# Altium PCB OmniCore_SDR.PcbDoc (part 13 of 14)
Units mil, origin at the board's own origin, x right, y up, seen from the top; angles counter-clockwise.
Board outline 4724.72 x 2755.91 mil, 8 copper layers (Top, GND 1, Layer 1, Layer 2, GND 2, Layer 3, Power, Bottom), stack 40.468 mil thick; 534 components, 427 nets, 2325 pads, 1892 vias.
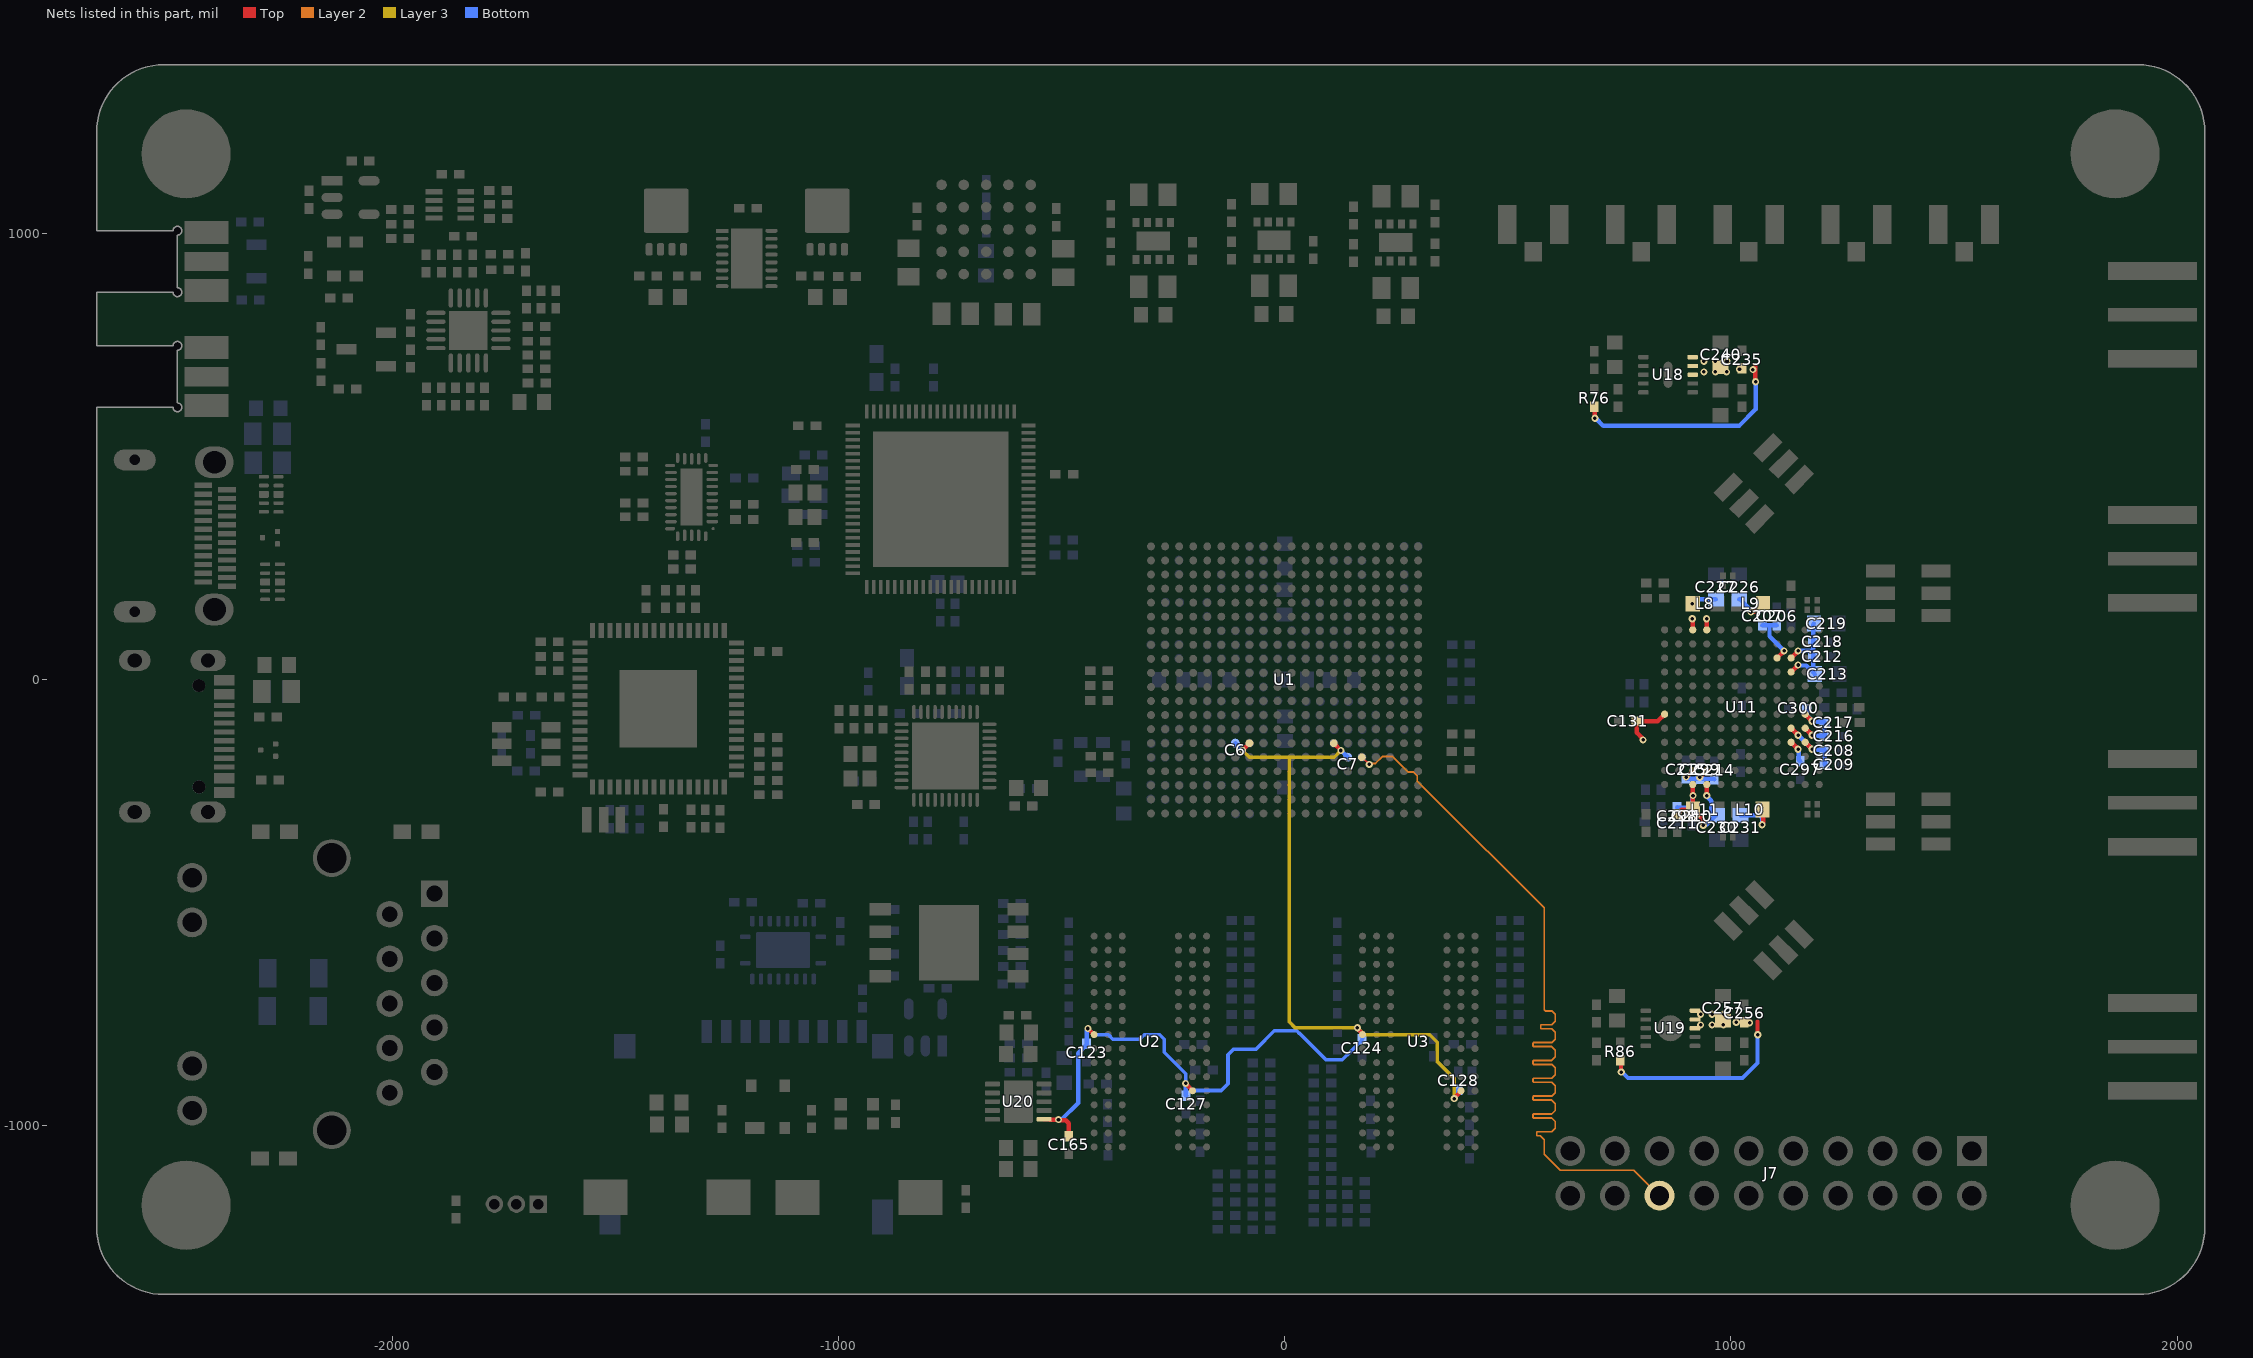
[diagram p18: the nets of this part, all layers, seen from the top]

## Via types
v1: diameter 16, hole 8, Top to Bottom, tented both sides, 1844 vias
v2: diameter 19.68, hole 7.87, Top to Bottom, 44 vias
v3: diameter 200, hole 125, Top to Bottom, 4 vias

## Nets (pads, with @x,y where several pads share a name; then routed paths per layer and width w, separated by ;. In a path a pad name is that pad's centre, name@x,y a point inside that pad or via, vN(x,y) a via of type N, cw(c..) or ccw(c..) an arc to the next point about the centre after c; other vN are vias at no path point) (continued)
USER_IO6_P: J7.16 U1.T5 | length 1985.8
  Top w4.2: U1.T5@172.98,-174.02 173.2,-174.02 189.4,-190.21 v1(189.62,-190.21)
  Layer 2 w4: v1(189.62,-190.21) 191.92,-187.92 203.61,-187.92 218.95,-172.58 242.33,-172.58 277.02,-207.26 289.02,-207.26 297.22,-215.46 297.22,-227.46 326.46,-256.7 581.5,-511.74 581.5,-734.9 581.5,-740.12 583.84,-742.47 598.71,-742.47 606.5,-750.26 606.5,-765.67 598.71,-773.47 575.15,-773.47 573.8,-774.82 573.8,-781.12 575.15,-782.47 598.71,-782.47 606.5,-790.26 606.5,-805.67 598.71,-813.47 557.85,-813.47 556.5,-814.82 556.5,-821.12 557.85,-822.47 598.71,-822.47 606.5,-830.26 606.5,-845.67 598.71,-853.47 557.85,-853.47 556.5,-854.82 556.5,-861.12 557.85,-862.47 598.71,-862.47 606.5,-870.26 606.5,-885.67 598.71,-893.47 557.85,-893.47 556.5,-894.82 556.5,-901.12 557.85,-902.47 598.71,-902.47 606.5,-910.26 606.5,-925.67 598.71,-933.47 557.85,-933.47 556.5,-934.82 556.5,-941.12 557.85,-942.47 598.71,-942.47 606.5,-950.26 606.5,-965.67 598.71,-973.47 557.85,-973.47 556.5,-974.82 556.5,-981.12 557.85,-982.47 598.71,-982.47 606.5,-990.26 606.5,-1005.67 598.71,-1013.47 566.34,-1013.47 564.99,-1014.82 564.99,-1021.12 566.34,-1022.47 572.71,-1022.47 581.5,-1031.25 581.5,-1050.7 581.5,-1063.6 617.47,-1099.57 782.7,-1099.57 839.63,-1156.5 J7.16@840,-1156.5
VDD_DIG: C131.2 C206.2 C207.2 C208.2 C209.2 C210.2 C211.2 C226.1 C227.1 C230.1 C231.1 C235.1 C240.1 C297.2 C298.2 L8.1 L9.1 L10.1 L11.1 R76.1 U11.A9 U11.A10 U11.D2 U11.D3 U11.E3 U11.F12 U11.K4 U11.M9 U11.M10 U18.8 U18.9 U18.10 | length 1565.3
  Top w4.2: v1(913.5,136.46) v1@914,135.95 ; U11.M10@914,111.94 U11.M10@914.5,111.44 ; v1(945.5,136.46) v1@945.75,136.2 ; U11.M9@945.75,111.69 U11.M9@946,111.44
  Top w10: R76.1@693.77,611.25 694.54,610.48 694.54,586.26 v1(695.3,585.5) ; v1(803.35,-135) 803.35,-133.38 788.69,-118.71 C131.2@788.69,-93 836.05,-93 U11.F12@851.51,-77.54 ; C211.2@885.34,-297.02 880.5,-301.86 880.5,-299.89 889.19,-291.2 L11.1@915,-291.2 ; U11.M10@914,111.94 v1@914,135.95 ; U11.A10@914.5,-235.02 914.75,-235.27 914.75,-259.75 v1(915,-260) L11.1@915,-291.2 ; L11.1@916.64,-291.2 L11.1@915,-291.2 ; v1(938.1,-326.6) 936.95,-325.45 936.95,-313.48 915,-291.53 L11.1@915,-291.2 ; U11.M9@945.75,111.69 v1@945.75,136.2 ; v1(946,-260) U11.A9@946,-235.02 ; C235.1@1024.77,697.25 1029.05,697.25 C235.1@1029.3,697.5 ; v1(1044.8,151.3) 1045.95,152.45 1053.11,152.45 1057.84,157.18 1059.81,157.18 1070.56,167.93 L9.1@1070.56,169.9 ; 1054.3,703.5 1054.3,668.5 v1(1055.3,667.5) ; v1(1069.9,-325.3) 1069.9,-323.68 1072.76,-320.82 L10.1@1072.76,-291.2 ; U11.K4@1103.48,48.45 v1(1119.23,64.2) ; U11.D3@1134.98,-140.53 v1(1150.72,-156.28) ; U11.E3@1134.98,-109.03 v1(1150.72,-124.78) ; U11.D2@1166.47,-140.53 v1(1182.22,-156.28)
  Bottom w10: v1(695.3,585.5) 696.92,585.5 713.92,568.5 1018.3,568.5 1055.3,605.5 v1(1055.3,667.5) ; C298.2@879.5,-286.54 879.65,-286.7 912.34,-286.7 913.85,-285.19 913.85,-261.15 v1(915,-260) ; v1(913.54,169.9) 915.16,169.9 925.16,179.9 C227.1@966.5,179.9 ; v1(938.1,-326.6) 939.25,-325.45 945.06,-325.45 965.54,-304.97 965.54,-303 955.78,-293.24 955.78,-271.4 946,-261.62 v1(946,-260) ; C226.1@1018.5,179.9 1020.46,179.9 1043.65,156.71 1043.65,152.45 v1(1044.8,151.3) ; C231.1@1021.5,-303.98 1064.04,-303.98 1069.9,-309.84 v1(1069.9,-325.3) ; C207.2@1070.5,121.77 1086.5,121.77 ; C206.2@1102.5,121.77 1086.5,121.77 ; v1(1119.23,64.2) 1086.5,96.93 1086.5,121.77 ; v1(1150.72,-156.28) 1151.87,-157.42 1151.87,-179.23 C297.2@1155.5,-182.86 ; v1(1150.72,-124.78) v1(1182.22,-156.28) 1183.37,-157.42 1208.74,-157.42 C208.2@1210.31,-159 C209.2@1210.31,-191
  other v1: 939.3,689.5 965.3,689.5 990.3,689.5 1049.3,694.5 1019.3,695.5 939.3,713.5 965.3,713.5 991.3,713.5
VDDA_RX_LO: C212.2 C213.2 C214.2 C215.2 C216.2 C217.2 C218.2 C219.2 C256.1 C257.1 C299.2 C300.2 R86.1 U11.B9 U11.B10 U11.E2 U11.F2 U11.J3 U11.K3 U19.8 U19.9 U19.10 | length 960.3
  Top w9: R86.1@751.98,-853.28 753.19,-854.49 753.19,-878.31 v1(754.39,-879.51) ; v1(1060,-796) 1060,-766
  Top w10: v1@900.5,-220.64 900.5,-219.08 914.5,-205.08 U11.B10@914.5,-203.52 ; v1(930.25,-219.27) U11.B9@946,-203.52 ; U11.J3@1134.98,16.95 v1(1150.72,32.7) ; U11.K3@1134.98,48.45 v1(1150.72,64.2) ; U11.E2@1166.47,-109.07 v1@1182.14,-124.74 ; U11.F2@1166.47,-77.54 v1(1182.22,-93.28)
  Bottom w9: v1(754.39,-879.51) 756.28,-879.51 769.77,-893 1026,-893 1060,-859 v1(1060,-796)
  Bottom w10: v1(899.5,-218.64) 902.58,-221.73 927.79,-221.73 v1(930.25,-219.27) 933.71,-222.73 962,-222.73 C214.2@962.5,-223.23 ; v1(1150.72,32.7) 1151.87,31.55 1168.84,31.55 1175.22,25.17 1177.19,25.17 C213.2@1184.5,17.87 ; v1(1150.72,64.2) 1180.89,64.2 1184.65,67.96 ; C300.2@1170.2,-64.56 1170.2,-79.64 1182.22,-91.66 v1(1182.22,-93.28) 1183.37,-94.43 1207.7,-94.43 C217.2@1209.81,-96.54 1210.31,-97.04 C216.2@1210.31,-127.04 ; v1(1182.14,-124.78) 1183.29,-125.93 1209.2,-125.93 C216.2@1210.31,-127.04 ; C219.2@1185.94,125.46 1184.81,124.33 C218.2@1184.81,84.46 1184.65,84.3 1184.65,67.96 ; C213.2@1187.94,12.46 1184.5,15.9 C213.2@1184.5,17.87 ; C216.2@1210.81,-127.54 C216.2@1210.31,-127.04 ; C213.2@1184.5,17.87 C212.2@1184.5,51.46 1184.65,51.61 1184.65,67.96
  other v1: 932,-774 958,-774 983,-774 1042,-769 1012,-768 932,-750 958,-750 984,-750
VTTREF: C6.2 C7.2 C123.1 C124.1 C127.2 C128.2 C165.1 U1.H6 U1.P6 U2.H1 U2.M8 U3.H1 U3.M8 U20.6 | length 2751.5
  Top w4.2: v1@-222,-905.45 v1(-222,-904.93) ; U2.M8@-206.5,-921.45 U2.M8@-206.5,-920.94 ; U1.P6@109.99,-142.76 U1.P6@109.99,-142.52 ; v1(126,-159) v1@126,-158.76
  Top w6: U3.M8@394.99,-922.73 U3.M8@394.99,-921.45
  Top w10: U20.6@-538.93,-985.37 -538.42,-985.88 -526.17,-985.88 -525.91,-986.15 v1(-506.84,-986.15) -505.69,-987.3 -490.7,-987.3 -484,-994 C165.1@-484,-1023.32 ; v1(-441,-782) -440.72,-782 -427.25,-795.47 U2.H1@-426.98,-795.47 ; v1@-222,-905.45 U2.M8@-206.5,-920.94 ; v1(-94.73,-158.27) U1.H6@-78.98,-142.52 ; U1.P6@109.99,-142.76 v1@126,-158.76 ; v1(163,-780.16) 164.15,-781.3 164.15,-783.55 174.52,-793.92 U3.H1@174.52,-795.47 ; v1(380,-939) 380,-937.72 U3.M8@394.99,-922.73
  Layer 3 w8: v1(-94.73,-158.27) -79,-174 10,-174 ; v1(126,-159) 111,-174 10,-174 ; v1(380,-939) 380,-893.92 342,-855.92 342,-813 325,-796 178.84,-796 v1(163,-780.16) 23.16,-780.16 10,-767 10,-174
  Bottom w8: v1(-441,-782) -440.72,-782 -426.72,-796 -395,-796 -385,-806 -325,-806 -315,-796 -280,-796 -270,-806 -270,-835 -222,-883 v1(-222,-904.93) -221.5,-905.43 -206,-920.93 -141.93,-920.93 -127,-906 -127,-841 -114,-828 -63.93,-828 -23.07,-787.14 27,-787.14 32.86,-793 33.5,-793 92.5,-852 129.16,-852 136.94,-844.22 136.94,-844.06 141,-840 141.28,-840 173,-808.28 C124.1@173,-806.32 175,-804.31 175,-793.78 163,-781.78 v1(163,-780.16)
  Bottom w10: v1(-506.84,-986.15) -501.15,-986.15 -501,-986 -499.96,-986 -462.84,-948.88 -462.84,-837.13 -443.36,-817.65 -443.36,-785.99 -441,-783.62 v1(-441,-782) ; v1@-221.5,-905.43 -221.5,-931.81 C127.2@-221,-932.31 ; C6.2@-110.6,-142.4 v1(-94.73,-158.27) ; v1(126,-159) 126.25,-159 141.15,-173.9 C7.2@141.4,-173.9 ; v1(380,-939) 380,-937.38 384.16,-933.22 384.16,-923.53 C128.2@389,-918.69
pads on no net: B2.5 D4.1 J5. J5.A8 J5.B8 J12.A8 J12.B8 U1.A10 U1.A12 U1.A14 U1.B12 U1.B13 U1.B14 U1.C6 U1.C12 U1.C13 U1.C15 U1.C16 U1.C18 U1.D15 U1.D16 U1.E6 U1.E13 U1.E16 U1.F12 U1.K9 U1.L10 U1.U7 U1.V5 U1.V7 U1.V10 U1.W11 U1.Y11 U2.J1 U2.J9 U2.L1 U2.L9 U2.M7 U3.J1 U3.J9 U3.L1 U3.L9 U3.M7 U5.8 U5.9 U5.12 U5.13 U6.31 U6.35 U10.21 U10.22 U10.23 U10.24 U10.26 U10.27 U10.28 U10.29 U10.30 U10.32 U10.33 U10.34 U10.36 U10.40 U10.41 U10.43 U10.44 U10.45 U10.46 U10.48 U10.52 U10.53 U10.54 U10.55 U10.57 U10.58 U10.59 U10.60 U11.A3 U11.B3 U11.B4 U11.B5 U11.B6 U11.B7 U11.C3 U11.L5 U11.M3 U11.M11 U12.C4 U14.24 U14.27 U15.7 U16.7 U17.2 U17.3 U18.4 U19.4 U23.1 U24.2 U24.3 U24.4 U24.5 U24.7 U24.8 U24.9 U24.10 U24.16 U24.17 U24.18 U24.21 U24.27 U24.31 U24.78 U24.80 U24.81 U25.3@-2287.76,415.24 U25.8@-2254.88,415.24 U26.3@-2284.76,218.87 U26.8@-2251.88,218.87 U28.1

## Polygon pours and split planes (outlines as drawn)
3V3 on Power "3V3_L07_P011" (solid, pour order 11): -183.5,790.5 -183.5,1363.7 -2454.11,1363.7 -2454.61,1364.2 -2546.4,1364.2 ccw(c-2546.4,1264.2) -2646.4,1264.2 -2646.4,-1264.4 ccw(c-2546.41,-1264.41) -2570.31,-1361.5 -460,-1361.5 -460,-823.8 -533.2,-823.8 -647.2,-937.8 -721.4,-937.8 -721.4,-782.8 -648.5,-709.9 -468.8,-709.9 -468.8,-530.2 -349.45,-410.85 -351.4,-408.9 -351.4,-210.1 387.64,-210.1 321.76,-136.22 -1079.23,-140.13 -1163.9,-224.8 -1562.1,-224.8 -1562.1,92.7 -1078.2,92.7 -983.8,-1.7 -484.8,-1.7 -816.5,330 -816.5,939.3 -527.6,939.3 -527.6,353.5 -309,134.9 70.5,134.9 70.5,310.9 129.2,369.6 129.2,790.5
1V8 on Power "1V8_L07_P002" (solid, pour order 2): 141.6,1038.8 141.7,1038.7 141.7,363 77.39,298.69 77.39,134.1 196,134.1 196.5,133.6 196.5,-8.6 -990.8,-8.6 -1082.73,83.33 -1551.02,83.33 -1551.02,-218.42 -1549.4,-216.8 -1168.3,-216.8 -1087.4,-135.9 323.8,-135.9 587.82,-399.92 587.82,-854.2 794.3,-854.2 794.3,781.3 536.9,1038.7 161.3,1038.7
VDD_DIG on Power "VDD_DIG_L07_P006" (solid, pour order 6): 801.7,779.43 1282.25,779.43 1282.25,141.32 1133.6,141.32 1133.6,-9.8 1163.8,-40 1163.8,-166.6 884.7,-166.6 884.7,-236.7 1105.9,-236.7 1121.2,-252 1121.2,-512.6 801.7,-512.6
1V35 on Power "1V35_L07_P010" (solid, pour order 10): -174.75,797.9 -173.25,799.4 129.2,799.4 129.2,1048.6 544.1,1048.6 804.3,788.4 1293.8,788.4 1293.8,-864.6 578.6,-864.6 578.6,-403.7 388.1,-213.2 -343.95,-213.2 -343.95,-415.8 -460.35,-532.2 -460.35,-716.5 -645.15,-716.5 -715.85,-787.2 -714.65,-788.4 -714.65,-934.1 -653.75,-934.1 -536.35,-816.7 -452.85,-816.7 -452.85,-1363.1 -451.13,-1361.38 1937.25,-1361.38 ccw(c1937.25,-1250.43) 2046.17,-1271.54 2046.17,1174.63 ccw(c2046.15,1174.56) 2046.17,1174.5 2049.03,1252.02 ccw(c1937.26,1252.03) 1937.25,1363.8 1913.05,1363.8 1912.65,1363.4 -171.25,1363.4
VDDA_RX_LO on Power "VDDA_RX_LO_L07_P004" (solid, pour order 4): 802.33,-519 1127.7,-519 1127.7,-247.2 1111.6,-231.1 890.5,-231.1 890.5,-172.1 1168.2,-172.1 1168.2,-34.3 1138.8,-4.9 1138.8,135.3 1282.3,135.3 1282.3,-854 801.46,-854
1V0 on Power "1V0_L07_P000" (solid, pour order 0): -805.07,932 -536.1,932 -536.1,348.8 -312.5,125.2 188.73,125.2 188.73,-1.43 189.1,-1.8 -476.6,-1.8 -805.07,326.67
GND on Layer 1 "GND_L03_P017" (solid, pour order 17): -2393.3,1378.2 -2393,1377.9 1962.7,1377.9 cw(c1962.7,1277.9) 2062.7,1277.9 2062.7,-1278.3 cw(c1962.7,-1278.3) 1962.7,-1378.3 -2562.3,-1378.3 cw(c-2562.3,-1278.3) -2662.3,-1278.3 -2662.3,1277.8 cw(c-2562.3,1277.8) -2562.3,1377.8 -2393.6,1377.8
1V8 on Layer 1 "1V8_L03_P003" (solid, pour order 3): -189.22,125.2 77.3,125.2 94.24,142.14 121.3,169.2 235,169.2 235,-112 188.73,-158.27 -157.72,-158.27 -189.22,-126.77
GND on Layer 3 "GND_L06_P019" (solid, pour order 19): -2393.3,1378.2 -2393,1377.9 1962.7,1377.9 cw(c1962.7,1277.9) 2062.7,1277.9 2062.7,-1278.3 cw(c1962.7,-1278.3) 1962.7,-1378.3 -2562.3,-1378.3 cw(c-2562.3,-1278.3) -2662.3,-1278.3 -2662.3,1277.8 cw(c-2562.3,1277.8) -2562.3,1377.8 -2393.6,1377.8
1V0 on Layer 3 "1V0_L06_P001" (solid, pour order 1): -171.92,125.74 164.96,125.74 231.8,58.9 231.8,-141.8 -129.9,-141.8 -171.85,-99.85
GND on Layer 2 "GND_L04_P018" (solid, pour order 18): -2393.3,1378.2 -2393,1377.9 1962.7,1377.9 cw(c1962.7,1277.9) 2062.7,1277.9 2062.7,-1278.3 cw(c1962.7,-1278.3) 1962.7,-1378.3 -2562.3,-1378.3 cw(c-2562.3,-1278.3) -2662.3,-1278.3 -2662.3,1277.8 cw(c-2562.3,1277.8) -2562.3,1377.8 -2393.6,1377.8
GND on Bottom "GND_L08_P016" (solid, pour order 16): -2393.3,1378.2 -2393,1377.9 1962.7,1377.9 cw(c1962.7,1277.9) 2062.7,1277.9 2062.7,-1278.3 cw(c1962.7,-1278.3) 1962.7,-1378.3 -2562.3,-1378.3 cw(c-2562.3,-1278.3) -2662.3,-1278.3 -2662.3,1277.8 cw(c-2562.3,1277.8) -2562.3,1377.8 -2393.6,1377.8
GND on GND 1 "GND_L02_P014" (solid, pour order 14): -2393.3,1378.2 -2393,1377.9 1962.7,1377.9 cw(c1962.7,1277.9) 2062.7,1277.9 2062.7,-1278.3 cw(c1962.7,-1278.3) 1962.7,-1378.3 -2562.3,-1378.3 cw(c-2562.3,-1278.3) -2662.3,-1278.3 -2662.3,1277.8 cw(c-2562.3,1277.8) -2562.3,1377.8 -2393.6,1377.8
GND on GND 2 "GND_L05_P013" (solid, pour order 13): -2393.3,1378.2 -2393,1377.9 1962.7,1377.9 cw(c1962.7,1277.9) 2062.7,1277.9 2062.7,-1278.3 cw(c1962.7,-1278.3) 1962.7,-1378.3 -2562.3,-1378.3 cw(c-2562.3,-1278.3) -2662.3,-1278.3 -2662.3,1277.8 cw(c-2562.3,1277.8) -2562.3,1377.8 -2393.6,1377.8
GND on Top "GND_L01_P015" (solid, pour order 15): -2393.3,1378.2 -2393,1377.9 1962.7,1377.9 cw(c1962.7,1277.9) 2062.7,1277.9 2062.7,-1278.3 cw(c1962.7,-1278.3) 1962.7,-1378.3 -2562.3,-1378.3 cw(c-2562.3,-1278.3) -2662.3,-1278.3 -2662.3,1277.8 cw(c-2562.3,1277.8) -2562.3,1377.8 -2393.6,1377.8

## Other copper
Top:
  rectangle net GND: 831.91,-863.28 898.3,-702.08
  rectangle net GND: 826.7,601.3 893.09,762.56
  pour cut-out: 1835,792.57 1826.28,801.3 1834.96,801.3 1835,801.26
  pour cut-out: 1835,245.72 1826.28,254.44 1834.96,254.44 1835,254.4
  pour cut-out: 1835,-301.14 1826.28,-292.42 1834.96,-292.42 1835,-292.46
  pour cut-out: 1835,-848 1826.28,-839.28 1834.96,-839.28 1835,-839.31
  pour cut-out: 1826.31,-806.69 1835.04,-797.96 1835.04,-806.65 1835,-806.69
  pour cut-out: 1826.31,-259.83 1835.04,-251.11 1835.04,-259.79 1835,-259.83
  pour cut-out: 1826.31,287.03 1835.04,295.75 1835.04,287.07 1835,287.03
  pour cut-out: 1826.31,833.89 1835.04,842.61 1835.04,833.92 1835,833.89
  region net GND: 1159.06,-318.75 cw(c1168.56,-309.25) 1155.12,-309.25 1155.12,-309.01 1154.79,-309.01 ccw(c1154.79,-319.89) 1147.1,-312.2 1152.61,-317.71 ccw(c1155.12,-315.2) 1155.12,-318.75
  region net GND: 1159.24,196.83 ccw(c1163.69,192.38) 1157.4,192.38 1157.4,192.49 ccw(c1146.62,192.49) 1154.24,200.11
  pour cut-out: -2500.94,229.14 -2500.94,285 -2485.1,285 -2453,252.9
  pour cut-out: -2505.64,433.07 -2505.64,385 -2434.32,385
  pour cut-out: 325.21,32 475.7,-118.49 475.7,-1100.7 -464.6,-1100.7 -464.6,-602.58 -785.91,-281.27 -1189.66,-281.27 -1189.66,28.67 -1313.25,152.26 -1313.25,323.35 -1003,323.35 -1003,555.4 -971.7,586.7 -606.1,586.7 -606.1,615.9 -586,636 -543,636 -304.7,397.7 -304.7,36.2
  pour cut-out: -464.6,-1100.7 -319.68,-1251.67 325.63,-1251.67 476.6,-1100.7
  pour cut-out: -464.6,-602.58 -535.89,-602.82 -519,-561.8 -484.8,-558.1
  pour cut-out: -539.43,-667.51 -540,-609.58 -571.7,-619.6
  pour cut-out: -1486.2,991 -1485.94,1015.23 -1473.34,1001.5
  pour cut-out: -1417.2,936.8 -1417.2,917.64 -1389.5,920.3 -1390.04,933.35 -1402.74,937.93
  pour cut-out: -692,964 -641,964 -646,991 -688.7,1000.6
  pour cut-out: -547.19,1054.35 -544.31,1008.69 -578.5,1030.1
  pour cut-out: -790.81,1063.02 -791.69,1008.69 -761,1025.2
  pour cut-out: -764.66,1080.5 -564.66,1080.5 -583.7,1058.1 -769,1058.69
  pour cut-out: 1007.6,-485.2 998.4,-494.9 998.4,-508.6 991.8,-504.2 995.7,-483.5 998.6,-479.6
  pour cut-out: 1107.02,-688.85 1100.91,-682.74 1095.15,-688.49
  pour cut-out: 1130.09,-653.55 1123.98,-659.67 1129.74,-665.42
  pour cut-out: 1201.07,473.25 1194.95,467.13 1200.71,461.37
  pour cut-out: 1165.77,496.32 1171.88,490.2 1177.64,495.96
  pour cut-out: 1511.2,-384.86 1502.57,-384.86 1502.57,-392.75
  pour cut-out: 1502.57,-343.61 1502.57,-352.23 1510.47,-352.23
  pour cut-out: 1511.18,127.14 1502.56,127.14 1502.56,119.25
  pour cut-out: 1502.56,168.42 1502.56,159.79 1510.45,159.79
  pour cut-out: 650.03,132.62 652.24,130.4 896.52,130.4 896.52,-217.04 911.52,-232.04 588.7,-232.04 588.7,62.8 583.03,68.47
  pour cut-out: -775.54,725.8 -776,726.26 -776,792 -725,792 -711,778
  pour cut-out: -2023.3,-449.4 -1869.2,-449.4 -1868,-448.2 -1865.55,-450.66 -1865.55,-503.56 -1396.66,-503.56 -1223,-329.9 -1223,-328 -1192,-297 -1187.7,-301.3 -768.75,-301.3 -768.75,-309.35 -711.9,-366.2 -722.9,-377.2 -722.9,-422.6 -1122.6,-422.6 -1365,-665 -1583.2,-665 -1583.2,-668.1 -1832.9,-917.8 -1947.7,-917.8 -2009.3,-856.2 -2011.01,-857.91 -2051.31,-857.91 -2047.8,-854.4 -2047.8,-447.9
  region net GND: 826.1,258.74 831.48,252.21 828.22,249.86 826.81,249.86 826.81,250.64 821.2,256.26
  pour cut-out: -2023.5,1120.33 -1926.93,1120.33 -1906.35,1099.75 -1906.35,1073.86 -2023.18,1073.86 -2042.4,1093.08 -2042.4,1120.2
  pour cut-out: -1111.5,564 -1111.5,328.35 -1116.5,323.35 -1003,323.35 -1003,561.6 -1000,564.6
  pour cut-out: -2089.17,707.57 -2089.17,669.27 -2090.56,670.66 -2120.03,670.66 -2120.03,689.97 -2111.23,698.77
  pour cut-out: 583.98,-231.1 483.56,-130.68 475.7,-130.68 475.7,-231.1 475.6,-231.2
  pour cut-out: -1561.9,91.7 -1560.67,90.47 -1251.46,90.47 -1251.46,-219.44 -1257.79,-213.11 -1564.92,-213.11
  pour cut-out: -728.52,-438.3 -727.92,-438.9 -675.9,-438.9 -675.9,-514.22 -675.05,-515.07 -674.98,-515 -597.7,-515 -597.7,-503.9 -580.6,-486.8 -674.95,-392.45 -681.35,-392.45
  pour cut-out: 46.22,528.22 46.22,508.18 162.6,391.8 162.6,308.7 57.27,308.7 47,298.43
  pour cut-out: 250.49,325.72 265.29,340.52 334.6,340.52 437.21,237.91 437.21,99.02 433.31,102.92 253.84,102.92
  pour cut-out: -100.7,565.1 -94.35,565.1 -74.96,584.49 12.02,497.5 15.5,497.5 15.5,338.8 14.8,338.1 -45.8,338.1 -45.8,508.8 -47.49,510.49
  region net GND: 281.1,1000.2 281.9,1001 389.8,1001 389.8,833.3 352.9,796.4 261.4,796.4 261.4,900.6 262.1,901.3 306.4,901.3 306.7,901 352.4,901 356.5,905.1 356.5,953.2 351.7,958 281.85,958
  region net GND: 6,1006.5 51.04,1006.5 56.34,1011.8 56.34,1053.7 37.14,1072.9 37.14,1100.24 71.4,1134.5 213.6,1134.5 245.2,1102.9 245.2,999 228.2,999 228.2,1036.2 210.7,1053.7 179,1053.7 165.8,1040.5 134.5,1040.5 134.5,797.8 -8.14,797.8 -8.14,914.7 77.24,914.7 85.24,922.7 85.24,963.9 5.39,963.9
  region net GND: -264.8,1004.4 -223,1004.4 -213.9,1013.5 -214.4,1014 -214.4,1055.9 -233.6,1075.1 -233.6,1101.6 -200.9,1134.3 -57.5,1134.3 -28.89,1105.69 -28.89,1004.69 -28.7,1004.5 -44.9,1004.5 -44.9,1045.9 -56.7,1057.7 -98.1,1057.7 -109.6,1046.2 -138.8,1046.2 -138.8,800 -281,800 -281,916.9 -193.5,916.9 -185.5,924.9 -185.5,962.7 -264.9,962.7 -265.4,962.2
  region net GND: -298.1,1002.2 -298.3,1002.4 -298.3,1105.9 -326.9,1134.5 -374.6,1134.5 -404.1,1105 -404.1,1052.2 -322.5,1052.2 -315.5,1045.2 -315.5,1002.2
  region net 1V8: 814.3,726.5 722.3,726.5 706.3,710.5 653.3,710.5 653.3,678.5 815.3,678.5
  region net VDD_DIG: 903.3,727.5 996.3,727.5 1013.3,710.5 1071.3,710.5 1071.3,677.5 903.3,677.5
  region net 5V_USB2: -2249,-56 -2187,-56 -2187,101 -2249,101
  region net USB3_VBUS: -2402.12,270 -2502,270 -2525,293 -2525,361 -2501,385 -2402.12,385 -2402.12,367 -2482,367 -2500,349 -2500,304 -2482,286 -2402.12,286
  region net GND: -2272,-241 -2266,-235 -2266,-215 -2242,-215 -2238,-219 -2238,-283 -2260,-305 -2340,-305 -2380,-265 -2399,-265 -2399,-241
  region net GND: -2336,-13 -2312,11 -2270,11 -2270,51 -2335,51 -2375,11 -2400,11 -2400,-12 -2401,-13
  region net NetJ5_A4: -2354,-210 -2401,-210 -2419,-192 -2419,-62 -2401,-44 -2328,-44 -2319,-53 -2272,-53 -2272,-1 -2312,-1 -2331,-20 -2411.12,-20 -2446,-54.88 -2446,-200 -2412,-234 -2354,-234
  region net 3V3: -555,-906.63 -555,-901 -551,-901 -546,-896 -546,-833 -521,-833 -521,-906.63
  region net 1V35: -607,-741 -607,-857 -644,-857 -679,-892 -679,-913 -672,-920 -638,-920 -638,-933 -714,-933 -714,-785 -670,-741
  region net DDRVTT: -638,-951 -638,-940 -714,-940 -714,-1075 -673,-1116 -606,-1116 -606,-1032 -627,-1032 -637,-1022 -637,-981 -638,-980 -670,-980 -678,-972 -678,-958 -671,-951
  region net 5V: 288,1235 361,1235 388,1208 388,1052 288,1052
  region net 5V: -1453,1235 -1462,1235 -1495,1202 -1495,1033 -1466,1004 -1451,1004
  region net 5V: -1462,1004 -1320,1004 -1320,1080 -1107,1080 -1107,1003 -950,1003 -949,1002 -949,1116 -924,1141 309,1141 306.98,1235 -1462,1235
  region net 5V: -1143.5,1080.5 -1106.5,1043.5 -1106.5,1080.5
  region net 5V: -1321.5,1044 -1284.5,1081 -1321.5,1081
  region net 5V: 217,1142 254,1105 254,1142
  region net 5V: -56,1142 -19,1105 -19,1142
  region net 5V: -326,1142 -289,1105 -289,1142
  region net 5V: 31,1105 68,1142 31,1142
  region net 5V: -240,1105 -203,1142 -240,1142
  region net 5V: -413,1105 -376,1142 -413,1142
  region net 5V: -847.5,1106.5 -810.5,1143.5 -847.5,1143.5
  region net 5V: -525,1144 -488,1107 -488,1144
  region net 1V8: 219.56,1009.69 219.56,1037.68 211.56,1045.69 179.56,1045.69 171.56,1037.69 171.56,957.69 164.56,950.69 143.56,950.69 141.56,948.69 141.56,797.2 239.56,797.2 239.56,901.69 218.56,922.69 218.56,947.69 217.56,948.69 204.56,948.69 204.56,1009.69
  region net 1V35: -53.44,1014.69 -53.44,1042.68 -61.44,1050.69 -93.44,1050.69 -101.44,1042.69 -101.44,962.69 -108.44,955.69 -129.44,955.69 -131.44,953.69 -131.44,799.68 -33.44,799.68 -33.44,906.69 -54.44,927.69 -54.44,952.69 -55.44,953.69 -68.44,953.69 -68.44,1014.69
  region net 3V3: -324,1013 -324,1041 -330.6,1047.6 -365.4,1047.6 -372,1041 -372,961 -379,954 -400,954 -402,952 -402,798 -304,798 -304,905 -325,926 -325,951 -326,952 -339,952 -339,1013
  region net 1V0: -634,932 -536,932 -536,791 -589,791 -589,851 -596,858 -622,858 -634,870
  region net 1V0: -702,933 -805,933 -805,792 -747,792 -747,852 -740,859 -714,859 -702,871
  region net GND: -676,980 -657,980 -641,964 -641,863 -622,844 -610,844 -610,789 -725,789 -727,789 -727,845 -705.82,845 -692,862.47 -692,964
  region net 5V: -846,996 -846,1169 -949,1169 -970,1148 -970,1003 -928,1003 -868,943 -697,943 -697,1022 -707,1032 -733,1032 -741,1024 -741,1001 -753,989 -839,989
  region net 5V: -490,988 -490,1168 -487,1171 -412,1171 -411,1170 -411,974 -443,942 -634,942 -634,1018 -626,1026 -603,1026 -594,1017 -594,999 -583,988
  region net 5V: -17.44,1015.69 -2.44,1015.69 -2.44,1035.69 22.56,1060.69 31.56,1069.69 31.56,1159.69 31.42,1159.55 -20.44,1159.55 -20.44,1015.69
  region net 5V: 255.56,1010.69 270.56,1010.69 270.56,1030.69 295.56,1055.69 309.47,1069.6 308.5,1154.55 252.56,1154.55 252.56,1010.69
  region net 5V: -288,1014 -273,1014 -273,1034 -248,1059 -239,1068 -239,1158 -239.14,1157.86 -291,1157.86 -291,1014
  region net 5V_USB2: -1030,894 -1030,920 -1001,949 -1001,990 -1111,990 -1111,962 -1116,957 -1163,957 -1163,946 -1087,946 -1058,917 -1058,894
  region net 5V_USB3: -1344,893 -1344,926 -1363,945 -1363,991 -1476,991 -1476,943 -1396,943 -1375,922 -1375,893
  region net 1V8: 819.51,-738.03 727.51,-738.03 711.51,-754.03 658.51,-754.03 658.51,-786.03 820.51,-786.03
  region net VDDA_RX_LO: 907.91,-736 996.09,-736 1013.09,-753 1075.91,-753 1075.91,-786 907.91,-786
GND 1:
  pour cut-out: 1163.1,-226.9 1163.1,-226.93 1209.88,-226.9 1209.88,-305.41 ccw(c1222.64,-300.96) 1213.92,-311.29 ccw(c1219.51,-305.33) 1217.78,-313.31 ccw(c1220.18,-307.09) 1219.52,-313.73 ccw(c1221.29,-308.24) 1221.02,-314 1278.17,-314 ccw(c1276.3,-312.19) 1278.75,-311.29 cw(c1337.46,-307.76) 1302.71,-260.3 1302.71,-373.59 ccw(c1281.64,-389.97) 1285.99,-363.64 1221.41,-363.64 cw(c1220.06,-298.17) 1155.12,-306.6 1155.12,-262.65 1155.12,-226.93
  pour cut-out: 1162.41,101.8 1162.41,101.82 1209.52,101.8 1209.59,170.71 cw(c1226.65,171.4) 1209.59,172.1 cw(c1225.74,172.75) 1209.59,173.4 cw(c1226.53,174.45) 1209.59,175.5 cw(c1223.44,176.23) 1209.59,176.96 cw(c1222.42,177.76) 1209.59,178.56 cw(c1228.22,179.09) 1209.59,179.62 cw(c1251.51,180.9) 1209.58,181.89 cw(c1209.27,182.14) 1209.52,181.83 cw(c1215.54,179.13) 1210.22,183.04 cw(c1215.74,180.6) 1210.94,184.26 cw(c1216.84,181.52) 1211.6,185.37 cw(c1217.19,183.07) 1212.19,186.48 1215.18,188.5 1219.68,189.36 1252.02,189.28 cw(c1254.23,150.51) 1256.47,189.28 cw(c1258.85,150.88) 1261,189.29 cw(c1263.86,148.73) 1265.65,189.36 cw(c1267.19,150.87) 1270.08,189.28 cw(c1269.03,175.11) 1276.11,187.43 cw(c1266.29,180.02) 1278.34,182.47 cw(c1264.01,181.43) 1278.35,180.38 cw(c1262.56,179.39) 1278.35,178.38 cw(c1261.65,177.33) 1278.35,176.27 cw(c1259.46,175.02) 1278.35,173.76 ccw(c1306.83,175.52) 1278.54,171.76 ccw(c1347.19,166.58) 1278.35,166.4 ccw(c1337.56,172.77) 1279.57,159.22 ccw(c1303.51,165.69) 1281.95,153.43 ccw(c1309.21,168.02) 1286.28,147.28 ccw(c1343.05,207.25) 1302.7,135.2 1301.98,248 cw(c1276.46,278.36) 1271.95,238.96 1212.16,238.96 ccw(c1216.74,179.9) 1157.51,179.83 1157.51,101.8
  pour cut-out: 1042.94,329.22 ccw(c1099.47,269.27) 1017.07,269.27 1017.07,104.06 969.37,104.06 969.37,404.54
  pour cut-out: 1041.13,-451.17 cw(c1099.4,-392.91) 1017,-392.91 1017,-227.7 969.3,-227.7 969.3,-526.08 967.98,-526.08
  pour cut-out: 1320.42,-787.3 cw(c1320.42,-687.3) 1249.71,-758.01 1077.6,-585.9 1025.8,-637.7 1228.24,-840.14 ccw(c1310.83,-709.65) 1274.31,-859.7 2052.01,-859.7 2052.01,-787.3
  pour cut-out: 2010.6,-241.9 2010.5,-242 1735.04,-242 ccw(c1735.03,-347.09) 1660.71,-272.79 1622,-311.5 cw(c1559.66,-241.25) 1577.9,-333.38 1417.61,-333.38 1417.61,-403.7 1587.33,-403.7 ccw(c1580.79,-286.11) 1668.56,-364.64 1699.82,-333.38 cw(c1747.57,-381.13) 1747.58,-313.6 2052.01,-313.6 2052.01,-241.9
  pour cut-out: 1758.2,306.6 ccw(c1760.92,187.78) 1674.95,269.85 1596.34,191.24 cw(c1564.83,225.17) 1563.1,178.9 1417.6,178.9 1417.6,108.6 1564.57,108.6 ccw(c1562.79,238.53) 1659.98,152.29 1728.18,220.48 cw(c1759.6,189.07) 1759.61,233.5 2052.01,233.5 2052.01,306.6 2011.9,306.6
  pour cut-out: 1551.8,853 ccw(c1565.35,714.05) 1457.5,802.7 1095.85,441.05 1147.65,389.25 1516.93,758.53 cw(c1571.96,708.82) 1568.57,782.9 2052.01,782.9 2052.01,853
  pour cut-out: 1005.5,-592.4 953.58,-540.48 982.38,-511.68 1034.3,-563.6
  pour cut-out: 1024.62,348.32 1077.05,400.75 1104.6,373.2 1052.17,320.77
  pour cut-out: 1299.04,-349.44 1371.8,-349.44 1371.8,-387.44 1299.04,-387.44
  pour cut-out: 1298.85,262.4 1371.6,262.4 1371.6,224.4 1298.85,224.4
  pour cut-out: 953.94,418.14 1006.95,471.15 1033.9,444.2 980.89,391.19
  pour cut-out: 1077.4,-522.1 1023.84,-468.54 1051.74,-440.64 1105.3,-494.2
  pour cut-out: 1299.04,-249.44 1371.8,-249.44 1371.8,-287.44 1299.04,-287.44
  pour cut-out: 1299.03,162.56 1371.78,162.56 1371.78,124.56 1299.03,124.56
  pour cut-out: -1493.42,410.2 -1422.2,410.2 -1422.2,351.6 -1493.18,351.6
  pour cut-out: -1493.52,512.9 -1422.6,512.9 -1422.6,453.2 -1493.28,453.2
  pour cut-out: 898.32,187.91 984.7,187.91 984.7,152.61 898.8,152.61
  pour cut-out: 1000.56,188.34 1086.94,188.34 1086.94,153.04 1001.04,153.04
  pour cut-out: 900.41,-273.4 987.8,-273.4 987.8,-309.1 900.9,-309.1
  pour cut-out: 1002.02,-273.5 1088.4,-273.5 1088.4,-308.8 1002.5,-308.8
Layer 1:
  rectangle net GND: -1474.2,992.34 -1367.33,1001.66
  pour cut-out: 1843.3,-787.5 1843.3,-857.5 2052.01,-857.5 2052.01,-787.3
  pour cut-out: 1843.3,-242.1 1843.3,-312.1 2052.01,-312.1 2052.01,-241.9
  pour cut-out: 1843.3,306.4 1843.3,236.4 2052.01,236.4 2052.01,306.6
  pour cut-out: 1843.3,852.8 1843.3,782.8 2052.01,782.8 2052.01,853
  pour cut-out: -1017,329.58 -1017,171.1 -1013.1,167.2 -1010.1,170.2 -721.1,170.2 -721.1,219.89 -749.91,248.7 -920.7,248.7 -938,266 -938,311 -976.27,349.27
  pour cut-out: 822.1,-122.7 958.98,-122.7 986.54,-150.26 890.8,-246 767.4,-246 767.4,-126.76 765.64,-125
  pour cut-out: -1067.42,1015.1 -982.76,1015.1 -969.88,1023.7 -969.88,1081.81 -1008.27,1099.64 -1041.91,1099.64 -1074.72,1087.39 -1083.32,1030.99
  pour cut-out: -1390.2,992.26 -1474.2,992.26 -1482,980.58 -1482,950.42 -1460.42,936 -1375.42,936 -1361,950.42 -1363.05,992.3
  pour cut-out: -1402.68,1099.64 -1369.04,1099.64 -1329.67,1063.69 -1336.24,1018.12 -1369.04,1005.91 -1402.68,1005.91 -1441.07,1023.7 -1441.07,1081.81
  pour cut-out: -991.09,992.34 -990.57,1023.77 -1067.49,1015.16 -1083.38,1031.06 -1082.77,993.37
  pour cut-out: -642.42,973 -719.94,973.67 -728.68,1017.34 -628.6,1017.8
  pour cut-out: -754.93,1058.13 -572.46,1059.1 -572.46,1033.61 -771.32,1033.61 -771.32,1058.13
  pour cut-out: -1121.2,950.8 -1120.7,865.72 -1076.71,909.7 -1082.95,931.05
  pour cut-out: -1183.01,-718.95 -1282.5,-654.82 -1235.58,-632
  pour cut-out: -310.32,927.18 -337.18,950.2 -352.44,908.25
  pour cut-out: -43.56,924.06 -71.24,955.26 -81.44,908.25
  pour cut-out: 231.23,919.48 199.76,952.26 189.56,905.25
  pour cut-out: 186.24,18.54 186.3,18.6 250,18.6 250,-22.8 244.34,-17.14 192.68,-17.14 192.68,5.36 183.61,14.43
  pour cut-out: 752.1,-955.9 1295.21,-955.9 1340.61,-1001.3 1320.19,-1021.72 761.22,-1021.72 715.2,-975.7
  region net GND: 948.99,-278 966.3,-260.69 966.3,-271.1 963.13,-271.1 948.67,-285.56 941.12,-278
  pour cut-out: 915.53,385.11 915.53,323.51 861.4,269.38 796.8,333.98 796.8,380.5 802.7,386.4
  pour cut-out: 830.4,263.1 830.4,184.59 749.3,265.68 749.3,290
  pour cut-out: 639.09,233 639.8,233 639.8,64.2 916.25,64.2 916.25,98.73 759.72,255.27 636.72,255.27
  pour cut-out: 267.38,129.34 535.9,129.34 535.9,-126.2 217.6,-126.2
  pour cut-out: 225.8,391.7 225.8,388.4 779.3,388.4 779.3,305.1 222.5,305.1
  pour cut-out: 197.1,421.2 197.1,418.57 73.75,418.57 73.75,351 194,351 194,349
  pour cut-out: -643.19,282.77 -643.19,281.5 -587.1,281.5 -587.1,242.54 -641.57,242.54
  pour cut-out: -610,447.8 -610,281.5 -533.8,281.5 -533.8,448.2
  pour cut-out: -686.25,-173 -686.25,-248.24 -624.74,-248.24 -624.74,-164.26
  pour cut-out: -794.52,151.48 -807.05,151.48 -807.05,-32.2 -608.9,-32.2 -608.9,155.18
  pour cut-out: -739.32,238.1 -645.96,238.1 -645.96,169.69 -739,169.69
  region net GND: 951.9,169.87 951.9,156.34 958.48,149.77 966.43,149.77 971.9,144.3 967.64,140.04 961.36,140.04 943.7,157.69 943.7,170.1
  pour cut-out: 951.9,189.97 952.1,190.17 1033.4,190.17 1033.4,150.17 1033.6,149.97 1033.4,149.77 951.9,149.77
  pour cut-out: 1052.66,-75.28 1197.4,-75.28 1197.4,-172.3 1088.6,-172.3
  pour cut-out: 1045.68,48.45 1045.68,-30.29 1182.4,-30.29 1182.4,79.46 1046.04,79.46
  pour cut-out: 1002.57,-152.84 1002.57,31.9 925.27,31.9 925.27,-151.47
  pour cut-out: 952.4,-271.3 952.6,-271.1 1033.9,-271.1 1033.9,-311.1 1034.1,-311.3 1033.9,-311.5 952.4,-311.5
  pour cut-out: 1299,262.5 1371.75,262.5 1371.75,224.5 1299,224.5
  pour cut-out: 1299.19,162.76 1371.95,162.76 1371.95,124.76 1299.19,124.76
  pour cut-out: 1093.8,-680.6 1041.88,-628.68 1070.68,-599.88 1122.6,-651.8
  pour cut-out: 1077.4,-522.1 1023.75,-468.45 1051.45,-440.75 1105.1,-494.4
  pour cut-out: 1005.5,-592.4 953.58,-540.48 982.38,-511.68 1034.3,-563.6
  pour cut-out: 1112.2,435.9 1164.63,488.33 1192.18,460.78 1139.75,408.35
  pour cut-out: 953.88,418.28 1006.32,470.72 1033.32,443.72 980.88,391.28
  pour cut-out: 1024.62,348.32 1077.05,400.75 1104.6,373.2 1052.17,320.77
  pour cut-out: 1423.7,162.1 1496.45,162.1 1496.45,124.1 1423.7,124.1
  pour cut-out: 1423.8,-349.1 1496.55,-349.1 1496.55,-387.1 1423.8,-387.1
  pour cut-out: 1299.05,-249.45 1371.8,-249.45 1371.8,-287.45 1299.05,-287.45
  pour cut-out: 1299.04,-349.44 1371.8,-349.44 1371.8,-387.44 1299.04,-387.44
  pour cut-out: -1161.9,-681.3 -1154.6,-674 -1086,-674 -1035,-725 -1047.25,-737.25 -1047.25,-747 -1136.94,-747 -1166.9,-717.04 -1166.9,-713 -1164.7,-715.2
  pour cut-out: -606.83,617.85 -557.81,617.85 -538.77,636.88 -524.8,622.9 -524.8,435 -592.3,435 -596,431.3 -602.79,438.09
  pour cut-out: -643.31,242.54 -607.66,242.54 -556.61,293.59 -556.61,224.5 -575,224.5 -620.98,178.52 -645.96,178.52
  pour cut-out: -874.3,-403.1 -868.7,-408.7 273.3,-408.7 436,-246 650.2,-246 680.4,-276.2 677.34,-279.26 677.34,-787.7 559.04,-787.7 540.14,-806.59 531.52,-797.97 -515.55,-797.97 -602.77,-710.75 -908.28,-710.75 -908.28,-417.28 -902.6,-411.6
  pour cut-out: -902.8,-472 -900.5,-474.3 -543.6,-474.3 -530.2,-487.7
  pour cut-out: -819.5,-263.4 -671.9,-263.4 -586.5,-178 -582.5,-182 -426.1,-182 -426.1,-356.66 -543.74,-474.3 -917.7,-474.3 -917.7,-350.6 -881.4,-314.3
  pour cut-out: -440.5,585.5 -377.8,648.2 -296.12,648.2 -276.92,629 -358.42,547.5 -440.5,547.5
  pour cut-out: -575.9,61.4 -229.58,61.4 -189.22,21.04 -189.22,-63.78 -307.88,-63.78 -426.1,-182 -664,-182 -664,0.4 -661.5,2.9
  pour cut-out: -462,258 -453.71,249.71 -266.71,249.71 -266.71,215.93 -340.64,142 -361.34,162.7 -465.7,162.7
  pour cut-out: -71.9,-176.2 17.45,-176.2 199.17,-357.92 299.02,-357.92 438.66,-497.56 438.66,-797.72 -450.73,-797.72 -454.2,-794.26 -454.2,-391.75 -236.45,-174
  pour cut-out: -413.8,-193.7 -337.81,-193.7 -293.76,-237.76 -392.4,-336.4 -417.2,-336.4
  region net 5V_USB2: -2187,-56 -2187,109 -2217,139 -2217,527 -2140,604 -1571,604 -1448,727 -1158,727 -1001,884 -1001,990 -1111,990 -1111,946 -1110,945 -1086,945 -1071.3,930.3 -1071.3,900.7 -1187,785 -1480,785 -1604,661 -2182,661 -2278,565 -2278,118 -2249,89 -2249,-56
Layer 2:
  rectangle net GND: -1398.71,994.24 -1361.32,999.87
  pour cut-out: 941.92,118.46 933.64,110.18 928.17,110.18 928.17,110.93 916.6,122.5 926.9,132.8 928.4,132.8
  pour cut-out: 931.54,166.32 943.4,154.46 949.08,154.46 949.08,151.68 941.6,144.2 918.9,144.2 918.9,149.8 925.48,156.39
  pour cut-out: 883.4,159.9 895.54,172.04 895.54,162.44 901.57,156.41 901.55,156.39 901.55,149.97 900.71,149.97 897.18,146.44
  pour cut-out: 1295.2,-1008.2 1295.2,-1119.79 1366.69,-1191.28 1384.69,-1173.28 1480.5,-1173.28 1480.5,-1039.72 1455.1,-1014.32 1316.12,-1014.32
  pour cut-out: 1184.2,-1015 1180.5,-1018.7 1180.5,-1173.28 1064.48,-1173.28 1060.6,-1169.4 1078.46,-1151.54 1078.46,-1002.16
  pour cut-out: 1001,-1016.5 1001,-1102.4 1025.43,-1126.83 1085.6,-1126.83 1085.6,-1025.14 1055.48,-995.02
  pour cut-out: 593.74,-1000.99 600.13,-994.6 860.6,-994.6 860.6,-997 885.8,-1022.2 883.46,-1024.54 883.46,-1162.22 704.22,-1162.22 582.52,-1040.52 582.52,-1013.47
  pour cut-out: -1024.9,996.27 -1102.54,996.99 -1116.96,982.57 -1116.96,952.41 -1095.38,937.99 -1010.38,937.99 -995.96,959.57 -996.96,982.57
  pour cut-out: 207.56,940.58 231.2,919.51 189.56,905.25
  pour cut-out: -63.44,943.58 -43.56,924.06 -81.44,908.25
  pour cut-out: -337.18,950.2 -310.32,927.18 -352.44,908.25
  pour cut-out: -991.03,992.27 -990.5,1023.7 -1067.42,1015.1 -1083.32,1030.99 -1082.7,993.3
  pour cut-out: -1067.42,1015.1 -982.76,1015.1 -969.88,1023.7 -969.88,1081.81 -1008.27,1099.64 -1041.91,1099.64 -1074.72,1087.39 -1083.32,1030.99
  pour cut-out: -1389.94,994.28 -1467.58,995 -1482,980.58 -1482,950.42 -1460.42,936 -1375.42,936 -1361,957.58 -1362,980.58
  pour cut-out: -1374.62,1105.22 -1343.53,1090.41 -1327.63,1066.62 -1327.63,1030.99 -1343.53,1015.09 -1428.19,1015.09 -1441.07,1046.18 -1444.09,1074.51 -1435.49,1087.39
  pour cut-out: 677.54,-495.56 677.54,-378.04 614.83,-315.33 614.83,-279.48 583.58,-279.48 571.5,-267.4 571.5,-459.1 582,-459.1 660.5,-537.6
  pour cut-out: -818.27,-499.74 -972.76,-499.74 -1005.75,-466.75 -978.8,-439.8 -867.9,-439.8
  pour cut-out: -1127.99,-437.33 -1164,-473.35 -1164,-493.98 -1112.08,-493.98 -1083.9,-465.8 -1083.4,-465.8
  pour cut-out: -807.05,-32.44 -657.5,-32.44 -643,-46.94 -643,-52 -797,-52 -800,-49
  pour cut-out: -651.24,-114.5 -651.24,-83.56 -662.9,-71.9 -674.4,-83.4 -686,-83.4
  pour cut-out: -678.76,-197 -678.76,-250.04 -674.1,-254.7 -666.4,-247 -635,-247
  pour cut-out: -1033,247.19 -1033,166.7 -1007.1,166.7 -979.5,194.3 -979.5,258
  pour cut-out: -560,565.42 -560,237.27 -563.37,233.9 -561.57,232.1 -526.1,232.1 -526.1,551.1 -528,553
  pour cut-out: 615.15,-1014.32 1340.78,-1014.32 1360,-995.1 1311.3,-946.4 618.07,-946.4 593.74,-970.73 593.74,-1031.25
  pour cut-out: 1040.76,104.65 1042.21,106.1 1075.8,106.1 1075.8,83.76 1066.27,74.23 1065.2,75.3 1039.3,75.3
  pour cut-out: 894.2,408.3 828.4,342.5 838.86,332.04 902.14,332.04 931.5,361.4
  pour cut-out: 895.75,303.07 895.98,303.3 951.8,303.3 951.8,327.05 912.55,366.3 885.28,366.3
  pour cut-out: 820.9,291.5 820.9,285.05 835.89,270.07 845.12,279.3 855.41,279.3 855.41,288.79 844.9,299.3
  pour cut-out: 732,127 728.7,123.7 683,123.7 683,113.7 714.2,82.5 722.96,91.26 742.32,91.26
  region net GND: 825.4,262.22 827.59,256.94 833.2,250.54 829,244.58 826.81,249.86 821.2,256.26
  pour cut-out: -920.6,38.5 -1020.6,38.5 -1020.6,-47.6 -981.6,-86.6 -794.7,-86.6
  pour cut-out: -2312.42,355.02 -2233.3,275.9 -2233.3,266.74 -2288.72,266.74 -2322.5,300.52 -2322.5,319.4
  pour cut-out: -545.58,563.9 -545.58,319.18 -519.8,293.4 -436.3,293.4 -436.3,323.2 -315.78,443.72 -315.78,563.9
  pour cut-out: -465.4,-531.9 -456.26,-541.04 -456.26,-792.2 -334.85,-792.2 -334.85,-1231.09 321.87,-1231.09 335.64,-1217.32 335.6,-1217.27 335.6,-810.8 397.6,-810.8 453.8,-754.6 449.5,-750.3 449.5,-527.7
  pour cut-out: -479,-487 -479,-486.5 -380.7,-388.2 -329.4,-439.5 -329.4,-449.3 -435.5,-555.4 -500.3,-490.6 -500.3,-486.2
  pour cut-out: -107.1,-689.2 4.38,-689.2 108.8,-793.62 108.8,-1181.7 33.42,-1257.08 -49.94,-1257.08 -49.94,-1224.06 -137.9,-1136.1 -137.9,-690.3
  pour cut-out: -1285.23,-551.73 -1287.2,-553.7 -1289.4,-551.5 -1289.4,-521.9 -1285.72,-521.9 -1239.32,-475.5 -1164.5,-475.5 -1164.5,-538 -1178.23,-551.73 -1228.07,-551.73
  pour cut-out: -1056,-367 -1018.26,-367 -1014.2,-371.06 -1014.2,-399.7 -1035.8,-399.7 -1103.8,-467.7 -1130,-441.5 -1130,-439.3
  pour cut-out: -669,181 -658,170 -442,170 -442,114.73 -447.02,109.71 -450.31,113 -658,113 -685.6,140.6 -685.6,179.6
  pour cut-out: 651.46,-859.4 758.8,-966.74 758.8,-987.6 651.1,-987.6 626.5,-963 626.5,-859.6 626.3,-859.4
  pour cut-out: -310.4,346.7 -242.4,414.7 382,414.7 714.2,82.5 1161.4,82.5 1197.48,46.42 1197.48,-182.02 1134.2,-245.3 594.8,-245.3 594.8,-527.43 -198.47,-527.43 -411.7,-314.2 -410.1,-312.6 -410.1,345.1
Layer 3:
  rectangle net GND: -1474.2,992.29 -1369.87,1001.69
  pour cut-out: -1881.11,607.26 -1790.8,607.26 -1777.74,594.2 -1777.74,573.8 -1781.62,573.8 -1813.44,541.98 -1888.98,541.98
  pour cut-out: -1362.71,144.97 -1370.22,144.97 -1397,171.75 -1366.32,202.43 -1366.32,215.68
  pour cut-out: 569.65,-333.75 572.34,-331.06 1149.32,-331.06 1195.4,-284.98 1195.4,-151.8 632.11,-151.8 581.91,-202
  pour cut-out: 1172.72,94.7 1194.2,116.17 1194.2,237 1144.4,187.2
  pour cut-out: 1178.64,-174.28 1180.09,-0.69 1088.5,-52.9
  pour cut-out: 231.2,919.51 199.76,952.26 182.4,900.5
  pour cut-out: -43.56,924.06 -71.24,955.26 -89.8,896.9
  pour cut-out: -312.05,923.02 -342.24,955.26 -352.9,885.6
  pour cut-out: -1024.9,996.27 -1102.54,996.99 -1116.96,982.57 -1116.96,952.41 -1095.38,937.99 -1010.38,937.99 -995.96,959.57 -996.96,982.57
  pour cut-out: -1067.42,1015.1 -982.76,1015.1 -969.88,1023.7 -969.88,1081.81 -1008.27,1099.64 -1041.91,1099.64 -1074.72,1087.39 -1083.32,1030.99
  pour cut-out: -1390.2,992.26 -1474.2,992.26 -1482,980.58 -1482,950.42 -1460.42,936 -1375.42,936 -1361,950.42 -1363.05,992.3
  pour cut-out: -1402.68,1099.64 -1369.04,1099.64 -1329.67,1063.69 -1336.24,1018.12 -1369.04,1005.91 -1402.68,1005.91 -1441.07,1023.7 -1441.07,1081.81
  pour cut-out: 332.72,-319.33 332.72,42.32 374.5,84.1 700.1,-241.5 1118.2,-241.5 1156.4,-203.3 1146.47,-193.37 1146.47,144.27 881.74,409 34.65,409 -10.63,454.28 -16.4,448.51 -16.4,165.5 140.1,165.5 241.8,63.8 241.8,-320.4
  pour cut-out: -340.17,-1245.09 -340.17,-219.6 -293.84,-173.27 -293.3,-173.8 235,-173.8 336.1,-274.9 336.1,-1253 -332.26,-1253
  pour cut-out: 660.2,-243.2 569.65,-333.75 318.3,-333.75 318.3,81.2 325.7,88.6
  pour cut-out: -1032,-149 -470.71,-149 -446.45,-173.27 -491.08,-217.9 -571.4,-217.9 -571.4,-224.8 -623.6,-277 -849,-277 -882,-310 -1114,-310 -1114,-231 -1110,-227
  pour cut-out: -1558.8,252.9 -1401.8,252.9 -1381.66,232.76 -1381.66,200.34 -1397,185 -1534.1,185 -1581.9,232.8 -1578.2,236.5 -1578.2,258.8
  pour cut-out: -1201,-6 -1198.9,-6 -1107.1,-97.8 -1110,-100.7 -1110,-237.6 -1127,-254.6 -1128.4,-253.2 -1162.7,-253.2 -1162.7,-244.3 -1214,-193 -1214,-5.2
  pour cut-out: -931.32,34.67 -931.32,-37.18 -913.5,-55 -589,-55 -589,-45.6 -542.5,0.9 -576,34.4 -639.2,34.4
  pour cut-out: -677,249 -556,249 -532,225 -532,176.6 -695.8,176.6 -700.6,181.4 -698.6,183.4 -698.6,244.2
  pour cut-out: -346.68,109.19 -211.59,109.19 -211.2,108.8 -220.93,99.07 -220.93,-1 -364,-1 -359.26,3.74 -359.26,113.46
  pour cut-out: -231.9,359.8 -228.2,363.5 -75.4,363.5 -31.74,319.84 -31.74,282.68 -32,282.68 -100.88,213.8 -367.33,213.8 -392.14,238.6 -373.8,256.94 -373.8,360.8
Power:
  pour cut-out: -484,-584 -476.27,-576.27 -468.8,-576.27 -468.8,-627.04 -473.07,-631.31 -486.39,-631.31
  pour cut-out: -2447.38,838.3 -2447.8,837.88 -2447.8,760.8 -2638.3,760.8 -2643,765.5 -2641.4,767.1 -2641.4,842
Bottom:
  rectangle net NetC233_1: -2185,-1055 -2093,-354
  pour cut-out: -1553.75,941.95 -1500.2,995.5 -1441.4,995.5 -1441.4,1038.44 -1374.62,1105.22 -1397.4,1128 -1456.8,1128 -1553.75,1028.7
  pour cut-out: -1379.62,1112.71 -1374.93,1117.4 -1312.2,1117.4 -1312.2,1109.3 -1271.3,1068.4 -1275.8,1063.9 -1275.8,883.6 -1314.7,883.6 -1342.3,911.2
  pour cut-out: -559.26,307.4 -559.26,270.46 -539.7,250.9 -514.68,275.91 -514.68,313 -560.98,313 -562,314.02
  pour cut-out: -530.8,427.89 -530.69,428.01 -502.01,428.01 -502.01,448.32 -513.68,460 -524.99,448.7 -534.7,448.7
  pour cut-out: 473.5,-68.6 473.5,-165.58 393.78,-245.3 331.6,-245.3 331.6,-166 318.6,-153
  pour cut-out: -638.7,984.6 -638.7,1006.6 -607.4,1037.9 -610.68,1041.19 -654.5,1041.19
  pour cut-out: -336.44,962 -336.9,962.46 -336.9,1017.4 -371.55,1017.4 -388.41,1000.54 -355.94,968.07
  pour cut-out: -63.37,960.2 -63.37,995.14 -91.23,1023 -107.6,1006.63 -107.6,968.75 -95.94,957.09
  pour cut-out: 208.63,954.2 210.6,956.17 210.6,1016.7 165.2,1016.7 161.1,1012.6 195.19,978.51 195.19,954.2
  pour cut-out: 136,994.79 136,933.42 188.68,933.42 185.63,936.47 185.63,966.74 154,998.37
  pour cut-out: -134.26,993.17 -134.26,942.06 -111,918.8 -95.94,933.86 -95.94,980.31 -115.52,999.89
  pour cut-out: -404.82,991.49 -404.82,937.6 -402.42,940 -352.44,940 -352.44,964.57 -359.44,971.56
  pour cut-out: -751.35,1040.13 -706,994.78 -706,1004 -668.82,1041.19 -687.7,1060.07 -731.42,1060.07
  pour cut-out: -1083.32,1038.88 -1086.2,1036 -1086.2,981.8 -1046.2,981.8 -1037.8,990.2 -1041.4,993.8 -1041.4,1031.1 -1044.6,1031.1 -1056,1042.5
  pour cut-out: -1444.09,1030.99 -1444.09,998.41 -1444.2,998.3 -1441.4,995.5 -1397.2,995.5 -1397.2,1023.7 -1391.7,1029.2
  pour cut-out: -1437.75,818 -1437.9,818.15 -1437.9,908.9 -1465.5,908.9 -1477.6,896.8 -1477.6,839
  pour cut-out: -1399.58,666 -1478.5,666 -1491.7,679.2 -1481,689.9 -1481,808.5 -1480.6,808.5 -1469.2,819.9 -1459.3,810 -1443.4,810 -1443.4,760.6 -1417.7,734.9
  pour cut-out: -1254.28,509.86 -1254.47,509.67 -1254.47,449.53 -1198.78,449.53 -1196.31,452 -1206.88,462.56 -1206.88,481.94
  pour cut-out: -1020.73,-481.16 -1020.73,-438.87 -1033.8,-425.8 -1036,-428 -1231,-428 -1231,-434.6 -1280.4,-484 -1280.4,-494.2 -1151.8,-494.2 -1150.9,-495.1
  pour cut-out: -664.75,-696 -667.8,-699.05 -667.8,-806.2 -691.6,-806.2 -736.5,-761.3 -692.4,-717.2 -692.4,-700.2
  pour cut-out: -667.7,-511.9 -640.3,-511.9 -610.4,-541.8 -637,-568.4 -637,-663.6 -640.1,-663.6 -653.5,-677 -676.1,-654.4 -676.1,-507.1 -666.1,-507.1 -661,-502
  pour cut-out: -635.55,-899.84 -678.46,-899.84 -712.4,-865.9 -709.85,-863.35 -709.85,-773.86 -576.8,-773.86 -554.5,-796.16 -588.75,-830.4 -603.3,-830.4
  region net GND: 856.7,-14.54 856.7,-22.75 849.26,-33.87 839.2,-34.26 847,-26.46 847,-15.42
  pour cut-out: 108.7,-793.1 45.4,-793.1 32.2,-806.3 77.9,-852 110.83,-852
  pour cut-out: 129.16,-866.27 133.4,-866.27 141.15,-874.02 141.15,-1016.75 126.15,-1016.75 119.7,-1010.3 120.1,-1009.9 120.1,-875
  pour cut-out: 761.42,-237.7 712.3,-237.7 691.25,-216.65 737.3,-170.6 753.1,-170.6
  pour cut-out: 1032.7,-227.6 1032.1,-228.2 1032.1,-305.2 1006.4,-305.2 940.2,-239 963.2,-216 980.6,-216
  pour cut-out: -452.7,-1084 -168.68,-1084 -149.68,-1103 -154.5,-1107.81 -154.5,-1243.6 -325,-1243.6 -463.4,-1105.2 -463.4,-1094.7
  pour cut-out: -491.3,-184 -487.85,-180.55 -475,-180.55 -475,-254.94 -482.06,-262 -506.42,-262
  pour cut-out: -291.18,-329.88 -289.67,-331.39 334.11,-331.39 334.11,253.27 335.2,254.37 335.2,288.5 -295.15,288.5 -304.32,297.68
  pour cut-out: -464.16,-529.34 -155.76,-529.34 -145.1,-540 -149.68,-544.59 -149.68,-1084 -452.7,-1084 -463.4,-1094.7
  pour cut-out: 132.8,-524.71 463.5,-524.71 463.5,-1082.1 454.33,-1091.27 139,-1091.27
  pour cut-out: 993,-61 1045.5,-61 1050.7,-66.2 1047.8,-69.1 1047.8,-170.2 968.9,-170.2 965.2,-166.5
  pour cut-out: 856.7,16.95 857.2,16.45 857.2,-96.4 944.26,-96.4 969.5,-71.16 969.5,-10.8 932.8,25.9 861.6,25.9
  pour cut-out: -475.4,-152.5 -420.5,-152.5 -385.32,-187.68 -389.6,-191.97 -389.6,-214.9 -468.3,-214.9 -474.6,-208.6
  pour cut-out: -307,310 -216.68,219.68 -157.72,219.68 -157.72,-74.02 -220.2,-136.5 -546,-136.5 -546,-88 -493.1,-35.1 -493.1,95.3 -492.56,95.3 -445.86,142 -386,142 -386,160 -345,201 -346.4,202.4 -346.4,266.5
  pour cut-out: 960.33,154.15 960.33,84.36 958.17,82.2 993.02,47.34 1106.36,47.34 1106.36,143.64 1095,155
  region net 5V_USB3: -2227,461 -2195,493 -1685,493 -1481,697 -1481,920 -1458,943 -1363,943 -1363,991 -1494,991 -1544,941 -1544,747 -1733,558 -2152,558 -2224,630 -2270,630 -2270,461
  region net USB3_VBUS: -2475.11,399.11 -2460,384 -2443,384 -2443,367 -2484.29,367
  region net USB3_VBUS: -2482,286 -2482,270 -2502,270 -2525,293 -2525,361 -2505,381 -2505,512 -2447,570 -2294,570 -2294,534 -2434,534 -2475,493 -2475,373 -2500,348 -2500,304 -2490,294
  region net USB3_VBUS: -2354,561 -2336,579 -2301,579 -2294,572 -2294,531 -2300,525 -2336,525 -2354,543
  region net 3V3: -546,-893 -522,-893 -522,-870 -516,-864 -476,-864 -476,-833 -546,-833

## Silkscreen, mask and mechanical layers (free items; w line width, h text height)
Top Overlay:
  drawing of 271 lines, arcs and shapes, not listed
  text "TRIG" at 491,1088.64 h70
  text "TX_LO" at 701.7,1088.68 h70
  text "REF_O" at 940,1088.68 h70
  text "SYNC" at 1198.07,1088.64 h70
  text "RX_LO" at 1421.7,1088.68 h70
  text "TX1" at 1662.1,880.1 h100
  text "PPS_IN" at -2295.18,836.1 h65 r90
  text "OmniCore SDR" at -526.55,613.43 h160
  text "LOCK" at -1632.31,607.9 h40
  text "10M_IN" at -2295.72,576.7 h65 r90
  text "RX1" at 1662.1,333.9 h100
  text "RX2" at 1662.1,-212.3 h100
  text "LAN_1000Mbps" at -2220.1,-285.82 h65
  text "TX2" at 1662.1,-758.5 h100
  text "DONE" at -1433.01,-919.3 h40
  text "RGB" at -995,-925.42 h40
  text "PL_KEY" at -1067.2,-1067.32 h65
  text "FAN" at -1771.6,-1073.04 h65
  text "RESET" at -1479.3,-1073.82 h65
  text "OMNICORE-SDR_Rev2.8-β Designed by LiRen" at -665.3,-1179.83 h60
  text "USER_IO" at 1646.5,-1221.04 h60 r90
Bottom Overlay:
  text "SD_CARD" at -1057.27,-736.72 h70
Top Solder:
  region: 1603.5,840.1 1603.5,885.1 1398.4,885.1 1398.4,840.1
  rectangle: 1559,219.2 1604,741.4
  rectangle: 1559,-285.1 1604,71.8
  rectangle: 1559,-960.3 1604,-867.62
  region: 1603.8,-960.7 1603.8,-915.7 1398.1,-915.7 1398.1,-960.7
  region: 1313.38,-960.7 1313.38,-915.7 1013.38,-915.7 1013.38,-960.7
  region: 928.65,-960.7 928.65,-915.7 574.7,-915.7 574.7,-960.7
  region: 1313.68,840.1 1313.68,885.1 1013.68,885.1 1013.68,840.1
  region: 928.95,840.1 928.95,885.1 574.5,885.1 574.5,840.1
  rectangle: 1559,-764 1604,-425.6
  rectangle: 574.7,252.4 619.7,493.88
  rectangle: 574.7,-575.57 619.7,-247.9
  rectangle: 574.7,-960.3 619.7,-660.3
  rectangle: 574.7,578.6 619.7,878.6
  region: 2063.57,960.8 1912.63,960.8 1605,1269.3 -2201.9,1269.3 -2421.3,1056.8 -2662.3,1056.8 -2662.4,1050 -2662.4,1227.76 cw(c-2512.36,1227.76) -2512.36,1377.8 1912.36,1377.8 cw(c1912.36,1227.56) 2062.6,1227.56 2062.6,1159.1
  region: -2663.3,-1057 -2662.8,-1057 -2417.1,-1057 -2205.2,-1269.5 1601.7,-1269.5 1912.89,-968.1 2062.2,-968.1 2062.2,-1227.96 cw(c1912.16,-1227.96) 1912.16,-1378 -2512.16,-1378 cw(c-2512.16,-1227.36) -2662.8,-1227.36 -2662.8,-1159.3
  lines w30: -1519.7,1033.2 -1519.7,866.7 ; -1519.7,1047.2 -1519.7,866.7 ; -1519.7,1058 -1519.7,1052.6 -1519.7,866.7 ; 1083.3,-640.6 ccw(c1085.71,-640.6) 1084.01,-642.31 1235.38,-793.68 ccw(c1305.92,-723.14) 1305.92,-822.9 1842.5,-822.9 ; 1148.12,443.62 1493.27,787.54 cw(c1567.32,713.49) 1567.32,818.21 1843.19,817.16 ; 1148.6,442.6 cw(c1150.05,442.6) 1149.02,443.62 ; 1476.1,143.3 1560.16,143.04 ccw(c1560.16,246.71) 1633.47,173.4 1702.7,242.5 cw(c1770.3,174.9) 1770.3,270.5 1840.7,270.5 ; 1476.9,-369.8 cw(c1479.56,-372.46) 1479.56,-368.7 1574.41,-368.7 ccw(c1574.41,-276.02) 1639.95,-341.55 1677.2,-304.3 cw(c1745.52,-372.62) 1745.52,-276 1842.3,-276 ; -1519.7,866.7 -1519.7,1070.5 -1652.1,1202.9 -2146.7,1202.9 -2238,1111.6 -2238,728.6 -2238,624 -2113.7,499.7 -1638.4,499.7 -1519.7,618.4 -1519.7,866.7
Bottom Solder:
  region: -2663.3,-1057 -2662.8,-1057 -2417.1,-1057 -2205.2,-1269.5 1601.7,-1269.5 1913.92,-967.1 2062.2,-967.1 2062.2,-1227.96 cw(c1912.16,-1227.96) 1912.16,-1378 -2512.16,-1378 cw(c-2512.16,-1227.36) -2662.8,-1227.36 -2662.8,-1159.3
  region: 2063.56,963.2 1910.24,963.2 1605,1269.3 -2201.9,1269.3 -2421.3,1056.8 -2662.3,1056.8 -2662.4,1050 -2662.4,1227.76 cw(c-2512.36,1227.76) -2512.36,1377.8 1912.36,1377.8 cw(c1912.36,1227.56) 2062.6,1227.56 2062.6,1159.1